# Altium PCB WIFI_BoardV4.10.PcbDoc (part 3 of 4)
Units mil, origin at the board's own origin, x right, y up, seen from the top; angles counter-clockwise.
Board outline 5550.17 x 2342.16 mil, 2 copper layers (Top Layer, Bottom Layer), stack 61.811 mil thick; 125 components, 90 nets, 434 pads, 155 vias.
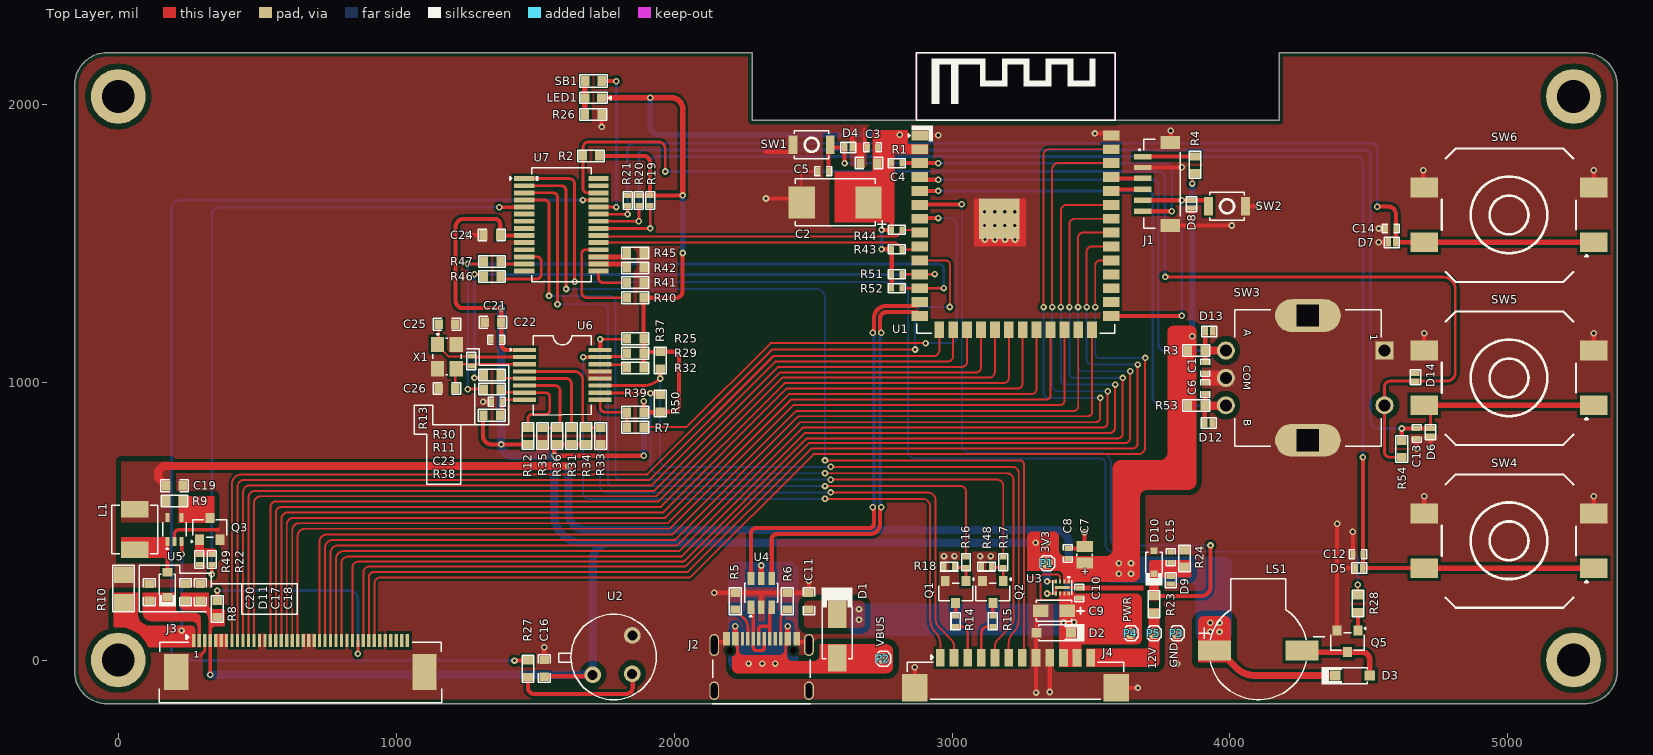
[diagram p0: Top Layer view]

## Part data (continued)
X1: library part SX3B14.7456F2010F30, "14.7456MHz Surface Mount Crystal 20pF ±10ppm ±30ppm SMD3225-4P Crystals ROHS", LCSC Part Number=C2901666, Manufacturer="Shenzhen SCTF Elec", Item Type=Crystal, Manufacturer Part Number=SX3B14.7456F2010F30, Pricing="5=0.0774, 50=0.0625, 150=0.0551, 500=0.0495, 3000=0.0447, 6000=0.0425 (USD)", RoHS=No, Stock=2580, Supplier=LCSC

## Free pads (board coordinates)
  round 196.85 hole 118.11: MH(0,0) MH(0,2027.56) MH(5236.22,0) MH(5236.22,2027.56)

## Via types
v1: diameter 23.62, hole 11.81, Top Layer to Bottom Layer, tented both sides, 155 vias

## Nets (pads, with @x,y where several pads share a name; then routed paths per layer and width w, separated by ;. In a path a pad name is that pad's centre, name@x,y a point inside that pad or via, vN(x,y) a via of type N, cw(c..) or ccw(c..) an arc to the next point about the centre after c; other vN are vias at no path point)
3V3_WIFI: C2.1 C3.2 C4.2 C7.1 C8.2 C16.1 C17.2 C18.2 C21.2 C22.2 C24.1 D3.2 J3.4 LED1.1 LS1.1 P1.1 R1.2 R2.1 R3.2 R4.1 R8.2 R12.2 R19.2 R20.2 R21.2 R25.2 R29.1 R31.2 R32.2 R34.2 R36.2 R37.2 R38.1 R39.2 R40.2 R43.2 R44.2 R50.1 R51.2 R52.2 R53.1 U1.2 U2.1 U3.1 U3.2 U3.4 U6.1 U7.9 | length 12762.1
  Top Layer w7: v1(3342.05,282.75) 3342.23,282.57 3372.82,282.57 U3.4@3372.99,282.4
  Top Layer w10: v1(3864.01,1714.28) 3864.01,1741.51 cw(c3874.4,1741.51) R4.1@3874.4,1751.9
  Top Layer w15: R38.1@1314.33,880.55 ccw(c1314.33,879.05) 1312.84,879.05 1312.84,805.76 ccw(c1342.84,805.76) 1342.84,775.76 v1(1378,775.76) R12.2@1474.75,775.76 ; C24.1@1374.34,1527.36 U7.9@1460.63,1527.36 ; C24.1@1374.34,1529.24 1374.34,1567.94 ccw(c1355.61,1567.94) 1355.61,1586.67 1241.67,1586.67 ccw(c1241.67,1559) 1214,1559 1214,1292.06 ccw(c1240.06,1292.06) 1240.06,1266 v1(1378,1266) 1378.17,1265.83 1378.17,1215.4 C21.2@1378.34,1215.23 ; C21.2@1378.93,1208.64 1378.93,1135.75 ccw(c1399.35,1135.75) 1399.35,1115.33 U6.1@1462.51,1115.33 ; C16.1@1532.99,-60.18 1534.85,-58.32 1702.25,-58.32 U2.1@1707.39,-53.18 ; v1(1569.03,735) R36.2@1569.03,775.76 ; v1@1579.03,735 v1@1887,735 ; R36.2@1579.03,775.76 R31.2@1631.06,775.76 R34.2@1683.53,775.76 ; R2.1@1731.41,1814 1889.14,1814 cw(c1889.14,1789.14) 1914,1789.14 R19.2@1914,1674.5 ; R21.2@1832.82,1671.5 R20.2@1873.41,1671.5 R19.2@1914,1671.5 v1(2031,1671.5) ; v1@1888,736 cw(c1887,736) v1@1887,735 ; R32.2@1890.53,1051.21 R29.1@1890.52,1103.72 ; v1(1890.88,735) v1@1887,735 ; v1(1890.88,930.97) 1890.71,930.79 1890.71,891.55 R39.2@1890.53,891.38 1948,891.38 ccw(c1948,893.38) R50.1@1950,893.38 1995.38,893.38 ccw(c1995.38,916) 2018,916 2018,1085.46 ccw(c1994.46,1085.46) 1994.46,1109 1950.79,1109 ccw(c1950.79,1108.21) R37.2@1950,1108.21 1895.02,1108.21 ccw(c1895.02,1103.72) R29.1@1890.52,1103.72 ; v1(2031,1464.37) ccw(c2031,1463.37) 2030,1463.37 2030,1326 cw(c2007.23,1326) 2007.23,1303.23 R40.2@1890.53,1303.23 R25.2@1890.52,1156.23 R29.1@1890.52,1103.72 ; v1(2746.64,1477.71) R43.2@2782.99,1477.71 R52.2@2782.99,1337.71 ; v1(2746.64,1547.71) R44.2@2782.99,1547.71 2782.99,1638.86 ; v1(3643.99,348.41) 3643.99,648.99 cw(c3685,648.99) 3685,690 3811.02,690 ccw(c3811.02,728.38) 3849.4,728.38 R53.1@3849.4,914.97
  Top Layer w20: LED1.1@1739.41,2022.89 v1(1914,2022.89) 1990.44,2022.89 cw(c1990.44,1982.33) 2031,1982.33 v1(2031,1671.5)
  Top Layer w25: R53.1@3849.4,914.97 3849.4,1113.4 3849.4,1165 ; LS1.1@3944.55,28.13 3968.17,28.13 3991.1,5.2 3991.1,3.96 4021.77,-26.71 ccw(c4092.48,44) 4092.48,-56 D3.2@4378.46,-56
  Top Layer w30: P1.1@3341.88,348.79 3341.88,421.64 v1(3342.05,421.81)
  Bottom Layer w15: v1(2746.64,1477.71) v1(2746.64,1547.71)
  Bottom Layer w20: v1(1890.88,735) v1(1890.88,930.97) ; v1(1914,2022.89) 1914,1921.41 ccw(c1945.41,1921.41) 1945.41,1890 2812.41,1890 v1(2812.41,1889.45) ; v1(2031,1464.37) v1(2031,1671.5)
  Bottom Layer w25: v1(3864.01,1714.28) 3864.4,1713.89 v1(3864.4,1165)
  Bottom Layer w30: v1@331.18,-53.18 U2.1@1707.39,-53.18 1707.39,357.59 cw(c1771.61,357.59) 1771.61,421.81 ; v1(1378,1266) v1(1378,775.76) 1378,773 ccw(c1416,773) 1416,735 v1(1569.03,735) 1569.03,521.81 ccw(c1669.03,521.81) 1647.53,424.15 ccw(c1669.03,521.81) 1669.03,421.81 1771.61,421.81 ; v1(3342.05,282.75) v1(3342.05,421.81) 1771.61,421.81
  other v1: 331,-53.18 3928.95,101 3962.47,101 3928.95,134.41 3962.47,134.41 3600.47,310 3643.99,310 3600.47,348.41 3300.57,421.99
BKL_CTRL: R22.2 U7.5 | length 2468.2
  Top Layer w13: v1(336.46,307.85) 336.78,308.16 336.78,343.18 R22.2@337.09,343.49 ; v1(1371,1629) U7.5@1459.91,1629
  Bottom Layer w10: v1(336.46,307.85) 336.46,1600.33 cw(c365.13,1600.33) 365.13,1629 v1(1371,1629)
BOOT0: J4.3 R14.2 | length 145.8
  Top Layer w10: R14.2@3013.07,120.8 3033.07,120.8 cw(c3033.07,97.59) 3056.29,97.59 J4.3@3056.29,8.31
BTN_1: C12.2 D5.2 R19.1 SW4.1 SW4.2 U7.21 | length 5380.9
  Top Layer w10: U7.21@1728.35,1552.95 v1(1914,1552.95) R19.1@1914,1634.5
  Top Layer w15: C12.2@4478.47,380.92 v1(4478.47,729.93) ; C12.2@4479.83,381.56 4478.47,380.2 D5.2@4478.47,330.55 SW4.2@4698.99,330.55
  Top Layer w20: SW4.2@4698.99,330.55 SW4.1@5309.22,330.55
  Bottom Layer w10: v1(1914,1552.95) 1914,1789.14 cw(c1936.39,1789.14) 1936.39,1811.53 4453.53,1811.53 cw(c4453.53,1786.59) 4478.47,1786.59 v1@4478.47,731.93
BTN_2: C13.2 D6.2 R20.1 R54.2 SW5.1 SW5.2 U7.22 | length 5028.7
  Top Layer w10: U7.22@1728.35,1578.54 v1(1873.41,1578.54) R20.1@1873.41,1634.5 ; SW5.2@4698.99,916.76 cw(c4698.99,894.27) 4721.47,894.27 D6.2@4721.47,833
  Top Layer w15: R54.2@4618.07,789.5 v1(4618.07,833) ; v1@4618.43,833.36 D6.2@4721.11,833.36
  Top Layer w20: SW5.2@4698.99,916.76 SW5.1@5309.22,916.76
  Bottom Layer w10: v1(1873.41,1578.54) 1873.41,1816.42 cw(c1892.33,1816.42) 1892.33,1835.34 1976.62,1835.34 4484.19,1835.34 cw(c4484.19,1814.06) 4505.47,1814.06 4505.47,860.73 ccw(c4533.2,860.73) 4533.2,833 v1(4618.07,833)
BTN_3: C14.2 D7.2 R21.1 SW6.1 SW6.2 U7.23 | length 4193.5
  Top Layer w10: U7.23@1728.35,1604.13 v1(1832.82,1604.13) R21.1@1832.82,1634.5
  Top Layer w15: v1(4530,1631.21) 4570.47,1631.21 cw(c4570.47,1604.38) 4597.3,1604.38 C14.2@4597.3,1552.55 ; C14.2@4596.58,1552.55 D7.2@4596.58,1502.97 SW6.2@4698.99,1502.97
  Top Layer w20: SW6.2@4698.99,1502.97 SW6.1@5309.22,1502.97
  Bottom Layer w10: v1(1832.82,1604.13) 1832.82,1838.16 cw(c1853.81,1838.16) 1853.81,1859.15 1949.75,1859.15 4508.81,1859.15 cw(c4508.81,1837.95) 4530,1837.95 v1(4530,1631.21)
BUZZER: R28.1 U7.1 | length 4438.6
  Top Layer w10: U7.1@1460.63,1732.09 1623.27,1732.09 cw(c1623.27,1713.22) 1642.14,1713.22 1642.14,1361.12 v1(1642.51,1360.75) ; v1(4459.85,270.59) 4459.85,233.43 R28.1@4460.39,232.89
  Bottom Layer w7: v1(1642.51,1360.75) 2817.4,1360.75 cw(c2817.4,1337.15) 2841,1337.15 2841,752.9 ccw(c2868.9,752.9) 2868.9,725 3533.23,725 cw(c3533.23,706.36) 3551.87,706.36 3551.87,415.83 ccw(c3578.22,415.83) 3578.22,389.48 4434.99,389.48 cw(c4434.99,364.24) 4460.23,364.24 4460.23,270.97 v1(4459.85,270.59)